# Altium PCB DB42.PcbDoc (part 5 of 8)
Units mil, origin at the board's own origin, x right, y up, seen from the top; angles counter-clockwise.
Board outline 3236.22 x 4456.69 mil, 8 copper layers (Top Layer, MidLayer1, MidLayer2, GND-Layer5, MidLayer3, VCC, MidLayer4, Bottom Layer), stack 62.194 mil thick; 214 components, 470 nets, 1802 pads, 1663 vias.
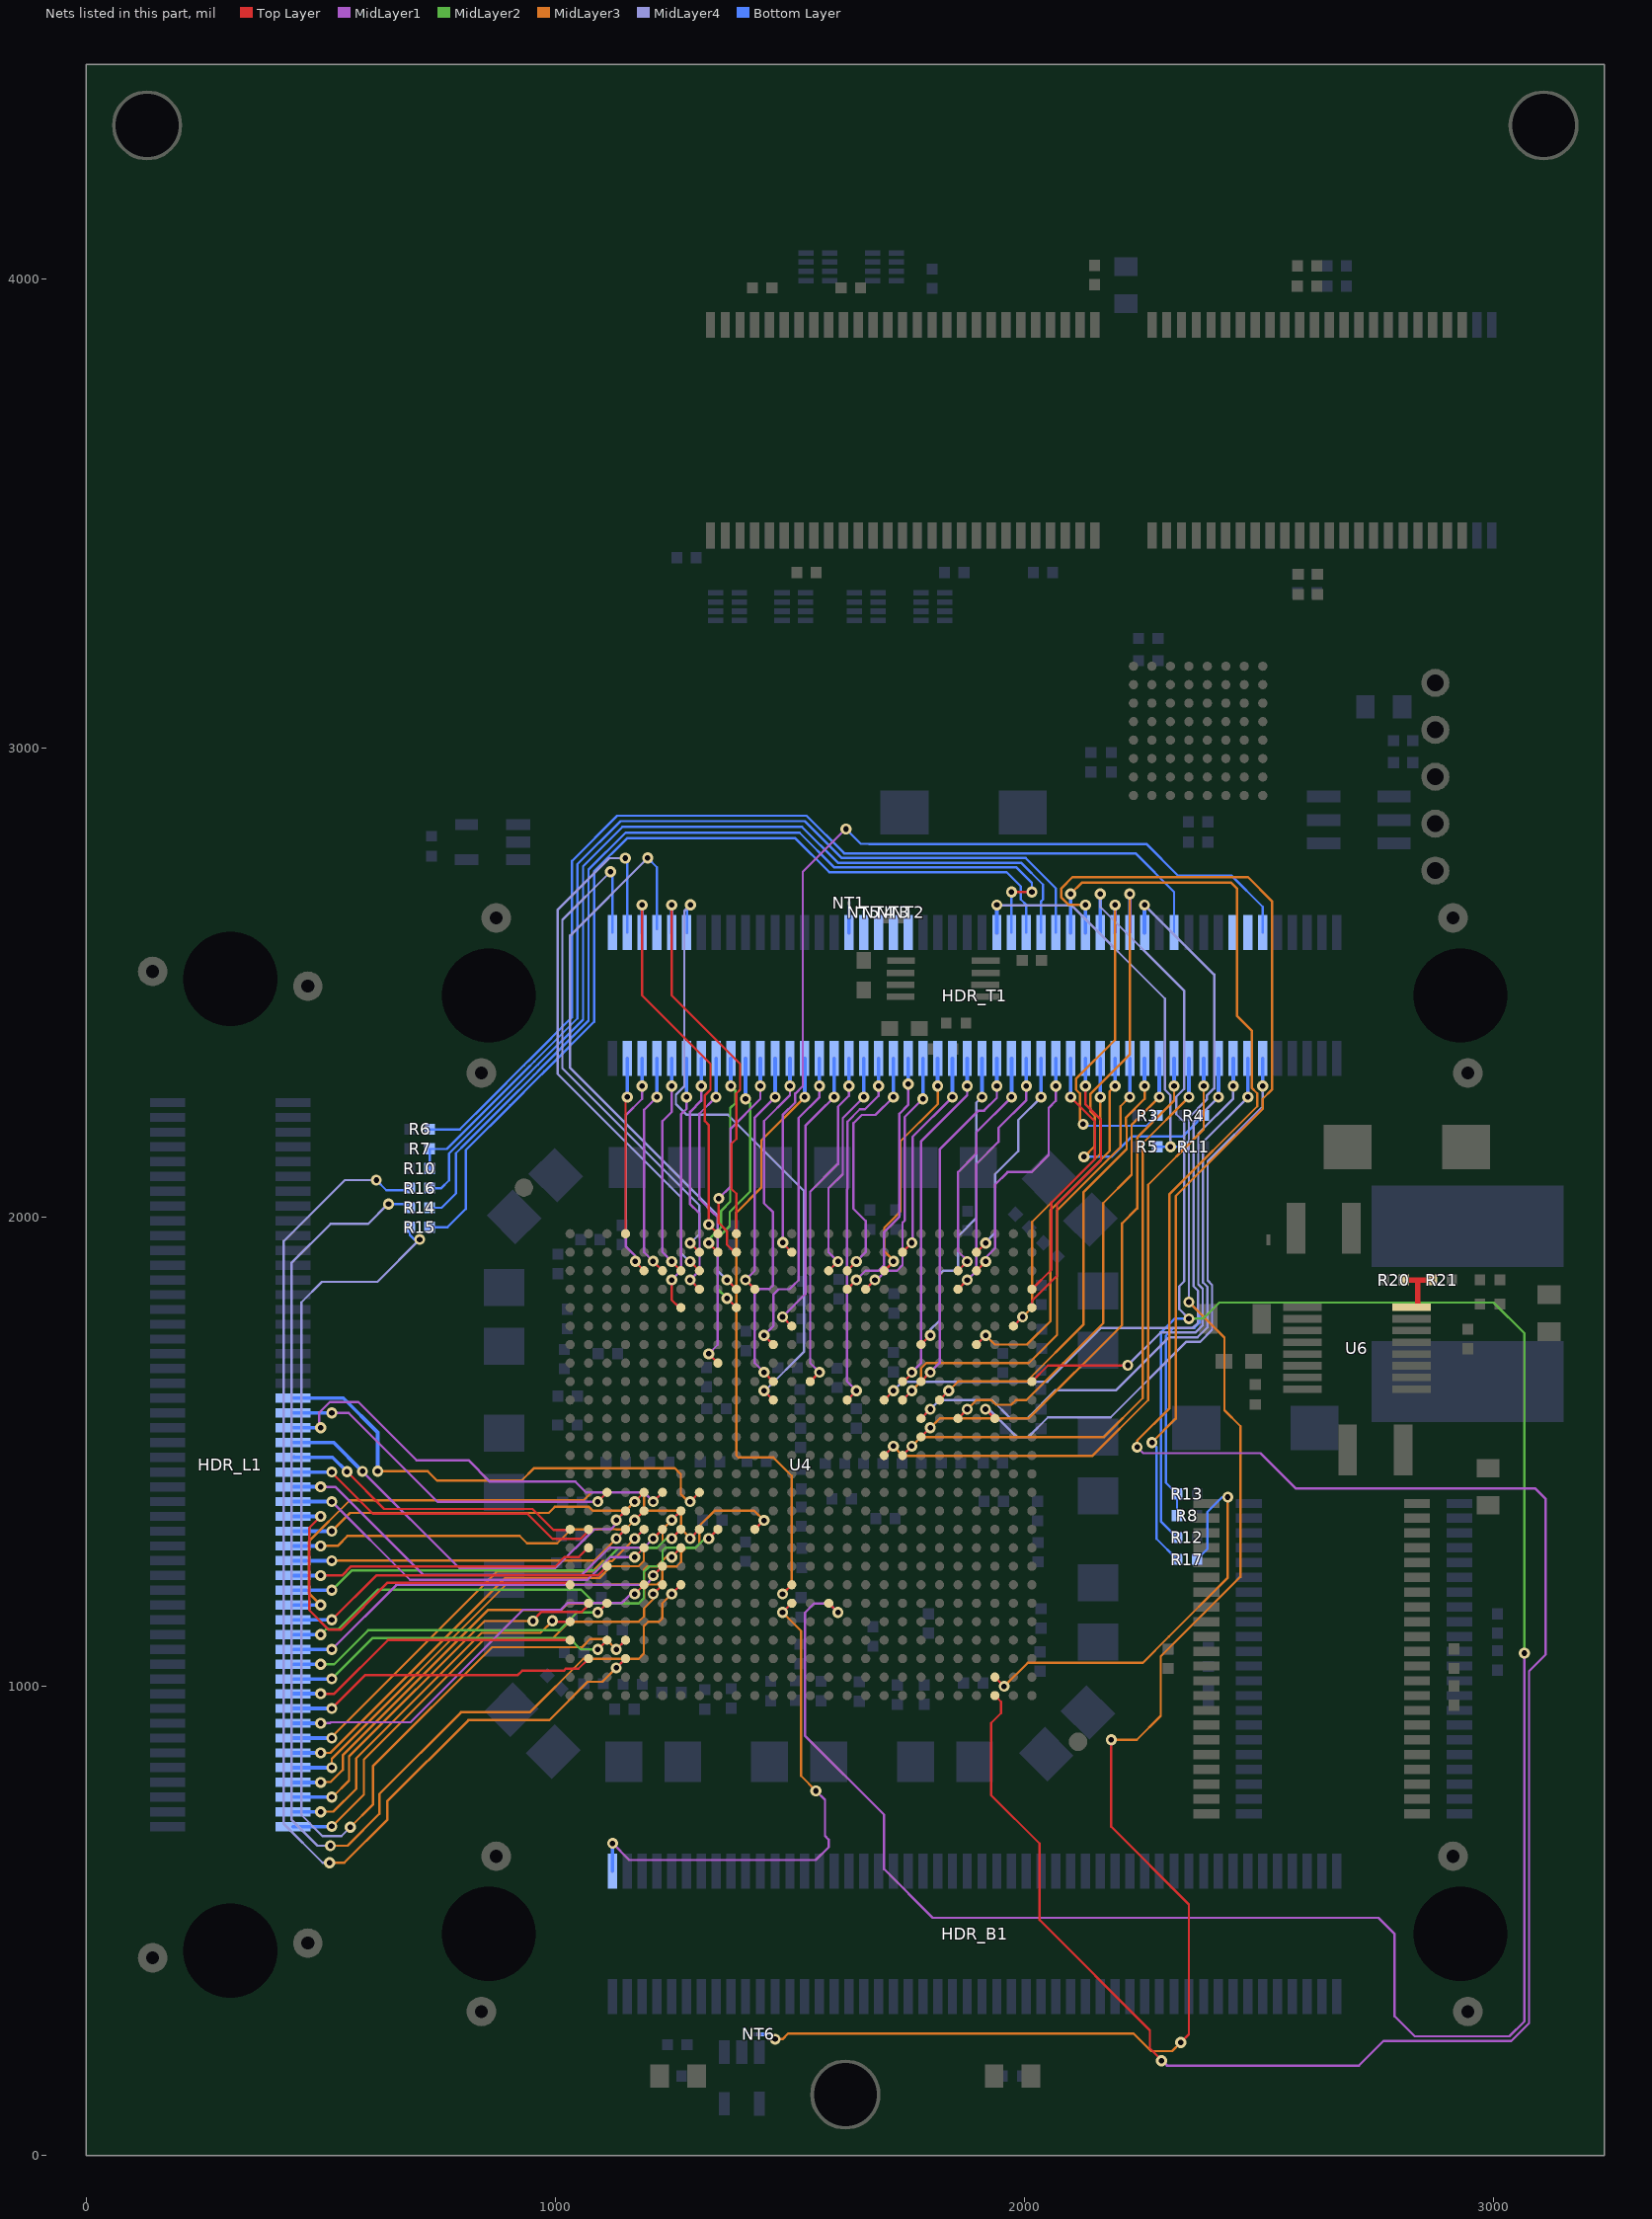
[diagram p11: the nets of this part, all layers, seen from the top]

## Via types
v1: diameter 23.62, hole 11.81, Top Layer to Bottom Layer, 1081 vias
v2: diameter 23.62, hole 11.81, Top Layer to Bottom Layer, tented both sides, 466 vias
v3: diameter 27.56, hole 15.75, Top Layer to Bottom Layer, 116 vias

## Nets (pads, with @x,y where several pads share a name; then routed paths per layer and width w, separated by ;. In a path a pad name is that pad's centre, name@x,y a point inside that pad or via, vN(x,y) a via of type N, cw(c..) or ccw(c..) an arc to the next point about the centre after c; other vN are vias at no path point) (continued)
EXTEND_B20: HDR_L1.42 U4.R8 | length 1060.6
  Top Layer w5: v1(1287.4,1393.7) U4.R8@1307.09,1413.39
  MidLayer3 w5: v2(621.34,1458.59) 727.86,1458.59 747.84,1438.61 928.18,1438.61 954.75,1465.18 1254.21,1465.18 1267.5,1451.89 1267.5,1409.73 1283.53,1393.7 v1(1287.4,1393.7)
  Bottom Layer w7.87: HDR_L1.42@440.94,1614.17 548.1,1614.17 621.34,1540.93 v2(621.34,1458.59)
EXTEND_B21: HDR_L1.44 U4.R3 | length 754.7
  Top Layer w5: v1(1090.55,1393.7) U4.R3@1110.24,1413.39
  MidLayer1 w5: v2(523.62,1582.68) 559.49,1582.68 748.86,1393.31 v1@1089.37,1393.31
  Bottom Layer w7.87: HDR_L1.44@440.94,1582.67 v2(523.62,1582.68)
EXTEND_B22: HDR_L1.46 U4.R6 | length 928.4
  Top Layer w5: v1(1208.66,1393.7) U4.R6@1228.35,1413.39
  MidLayer1 w5: v2@501.17,1553.15 496.82,1557.5 496.82,1583.43 519.29,1605.91 580.01,1605.91 704.01,1481.9 814.75,1481.9 860.53,1436.13 1043,1436.13 1065.75,1413.39 1188.18,1413.39 1188.58,1413.78 v1(1208.66,1393.7)
  Bottom Layer w7.87: HDR_L1.46@440.94,1551.18 v2(500,1551.18)
EXTEND_B23: HDR_L1.48 U4.T4 | length 875.1
  Top Layer w5: v1(1129.92,1354.33) U4.T4@1149.61,1374.02
  MidLayer1 w5: v2(589.03,1458.19) 795.58,1251.65 999.88,1251.65 1083.11,1334.87 1118.57,1334.87 1129.92,1346.23 v1(1129.92,1354.33)
  Bottom Layer w7.87: HDR_L1.48@440.94,1519.68 523.62,1519.68 527.54,1519.68 v2(589.03,1458.19)
EXTEND_B24: HDR_L1.50 U4.U1 | length 654.8
  Top Layer w5: v2(555.93,1457.41) 635.25,1378.09 951.24,1378.09 996.03,1333.3 U4.U1@1031.1,1333.3
  Bottom Layer w7.87: HDR_L1.50@440.94,1488.19 HDR_L1.50@442.07,1488.19 ; HDR_L1.50@442.41,1488.53 HDR_L1.50@442.07,1488.19 ; v2(555.93,1457.41) 525.15,1488.19 HDR_L1.50@442.07,1488.19
EXTEND_B25: HDR_L1.52 U4.U2 | length 696.2
  Top Layer w5: v2@523,1456.07 611.34,1367.72 940.73,1367.72 994.06,1314.38 1053.95,1314.38 U4.U2@1070.87,1331.3
  Bottom Layer w7.87: HDR_L1.52@440.94,1456.69 v2(523.62,1456.69)
EXTEND_B26: HDR_L1.54 U4.U6 | length 905.1
  Top Layer w5: v1(1208.66,1314.96) U4.U6@1228.35,1334.65
  MidLayer1 w5: v2(500,1425.2) 531.11,1425.2 718.48,1237.83 1057.23,1237.83 1114.87,1295.47 1189.09,1295.47 1208.58,1314.96 v1(1208.66,1314.96)
  Bottom Layer w7.87: HDR_L1.54@440.94,1425.19 v2(500,1425.2)
EXTEND_B27: HDR_L1.56 U4.V5 | length 846.1
  Top Layer w5: v1(1169.29,1275.59) U4.V5@1188.98,1295.28
  MidLayer1 w5: v2(523.62,1393.7) v2@523.75,1393.7 ; v2@523.75,1393.58 690.32,1227.01 1068.58,1227.01 1117.17,1275.59 v1(1169.29,1275.59) v1@1169.29,1274.8
  Bottom Layer w7.87: HDR_L1.56@440.94,1393.7 v2(523.62,1393.7)
EXTEND_B28: HDR_L1.58 U4.Y1 | length 885.8
  Top Layer w5: v2(500,1362.21) 475.56,1337.76 475.56,1162.3 517.32,1120.54 542.18,1120.54 642.65,1221.01 1027.03,1221.01 U4.Y1@1031.5,1216.54
  Bottom Layer w7.87: HDR_L1.58@440.94,1362.2 v2(500,1362.21)
EXTEND_B29: HDR_L1.60 U4.R5 | length 790.8
  Top Layer w5: v1(1169.29,1393.7) U4.R5@1188.98,1413.39
  MidLayer3 w5: v2@522,1331 523.62,1331 562.35,1369.73 985.97,1369.73 998.76,1382.52 1071.93,1382.52 1080.43,1374.02 1149.61,1374.02 v1(1169.29,1393.7)
  Bottom Layer w7.87: HDR_L1.60@440.94,1330.71 v2(523.62,1330.71)
EXTEND_B30: HDR_L1.62 U4.T5 | length 791.5
  Top Layer w5: v1(1169.29,1354.33) U4.T5@1188.98,1374.02
  MidLayer3 w5: v2@501.17,1299.41 535.83,1299.41 556.94,1320.53 923.98,1320.53 939.72,1304.78 1003.78,1304.78 1033.25,1334.25 1090.07,1334.25 1090.84,1335.02 1129.63,1335.02 1130.38,1334.26 1149.23,1334.26 v1(1169.29,1354.33)
  Bottom Layer w7.87: HDR_L1.62@440.94,1299.21 v2(500,1299.21)
EXTEND_B31: HDR_L1.64 U4.U4 | length 740.1
  Top Layer w5: v1(1129.92,1314.96) U4.U4@1149.61,1334.65
  MidLayer3 w5: v2(523.62,1267.72) v2@525.2,1267.72 ; v2@523.62,1269.29 524.41,1268.5 v2@525.2,1267.72 ; v1@1131.1,1315.75 1130.12,1314.76 1083.07,1267.72 v2@525.2,1267.72
  Bottom Layer w7.87: HDR_L1.64@440.94,1267.71 v2(523.62,1267.72)
EXTEND_B32: HDR_L1.66 U4.V2 | length 655.6
  Top Layer w5: v2@501.58,1237.8 v2(500,1236.22) 545.28,1236.22 564.73,1255.67 ; 564.82,1255.58 999.63,1255.58 1019.42,1275.38 1050.01,1275.38 U4.V2@1069.91,1295.28
  Bottom Layer w7.87: HDR_L1.66@440.94,1236.22 v2(500,1236.22)
EXTEND_B33: HDR_L1.68 U4.U7 | length 880.6
  Top Layer w5: v1(1248.03,1314.96) U4.U7@1267.72,1334.65
  MidLayer2 w5: v2(523.62,1204.72) 565.63,1246.73 1086.34,1246.73 1134.69,1295.08 1216.67,1295.08 1236.55,1314.96 v1(1248.03,1314.96)
  Bottom Layer w7.87: HDR_L1.68@440.94,1204.72 v2(523.62,1204.72)
EXTEND_B34: HDR_L1.70 U4.U8 | length 1160.6
  Top Layer w5: v1(1287.4,1314.96) U4.U8@1307.09,1334.65
  MidLayer3 w5: v2@499.2,1174.03 473.98,1199.25 473.98,1308.47 562.05,1396.54 1060.3,1396.54 1077.48,1413.72 1179.53,1413.72 1189.09,1404.17 1189.09,1380.18 1195,1374.27 1258.83,1374.27 1267.89,1365.21 1267.89,1335.66 v1@1287.4,1316.15
  Bottom Layer w7.87: HDR_L1.70@440.94,1173.23 v2(500,1173.23)
EXTEND_B35: HDR_L1.72 U4.W3 | length 716.6
  Top Layer w5: v2(523.62,1141.73) 618.11,1236.22 1090.55,1236.22 U4.W3@1110.24,1255.91
  Bottom Layer w7.87: HDR_L1.72@440.94,1141.73 v2(523.62,1141.73)
EXTEND_B36: HDR_L1.74 U4.U9 | length 1069.3
  Top Layer w5: v1(1326.77,1314.96) U4.U9@1346.46,1334.65
  MidLayer2 w5: v2(500,1110.24) 511.48,1121.72 537.4,1121.72 622.03,1206.34 1054.29,1206.34 1083.75,1176.88 1178.06,1176.88 1188.7,1187.52 1188.7,1243.86 1200.91,1256.07 1218.25,1256.07 1228.49,1266.32 1228.49,1289.17 1234.8,1295.47 1299.02,1295.47 1318.51,1314.96 v1(1326.77,1314.96)
  Bottom Layer w7.87: HDR_L1.74@440.94,1110.23 v2(500,1110.24)
EXTEND_B37: HDR_L1.76 U4.W6 | length 863.1
  Top Layer w5: v1(1208.66,1236.22) U4.W6@1228.35,1255.91
  MidLayer1 w5: v2(523.62,1078.74) 661.16,1216.28 1192.64,1216.28 1208.66,1232.3 v1(1208.66,1236.22)
  Bottom Layer w7.87: HDR_L1.76@440.94,1078.74 v2(523.62,1078.74)
EXTEND_B38: HDR_L1.78 U4.AA3 | length 723.1
  Top Layer w5: v1(1090.55,1157.48) U4.AA3@1110.24,1177.17
  MidLayer2 w5: v2(500,1047.25) 528.68,1047.25 600.72,1119.29 1008.57,1119.29 1046.77,1157.48 v1(1090.55,1157.48)
  Bottom Layer w7.87: HDR_L1.78@440.94,1047.24 v2(500,1047.25)
EXTEND_B39: HDR_L1.80 U4.AC3 | length 723.7
  Top Layer w5: v1(1090.55,1078.74) U4.AC3@1110.24,1098.42
  MidLayer2 w5: v2(523.62,1015.75) 610.94,1103.06 1029.54,1103.06 1053.86,1078.74 v1(1090.55,1078.74)
  Bottom Layer w7.87: HDR_L1.80@440.94,1015.74 v2(523.62,1015.75)
EXTEND_B40: HDR_L1.82 U4.AC1 | length 638.2
  Top Layer w5: v2(500,984.25) 528.74,984.25 643.19,1098.7 1003.94,1098.7 ; 1003.7,1098.42 U4.AC1@1031.5,1098.42
  Bottom Layer w7.87: HDR_L1.82@440.94,984.25 v2(500,984.25)
EXTEND_B41: HDR_L1.84 U4.AD2 | length 673
  Top Layer w5: v2(523.62,952.75) 595.17,1024.3 920.13,1024.3 929.02,1033.2 1017.85,1033.2 1022.17,1037.52 1049.29,1037.52 1070.04,1058.27 U4.AD2@1070.04,1058.5
  Bottom Layer w7.87: HDR_L1.84@440.94,952.75 v2(523.62,952.75)
EXTEND_B42: HDR_L1.86 U4.Y5 | length 873.2
  Top Layer w5: v1(1169.29,1196.85) U4.Y5@1188.98,1216.54
  MidLayer1 w5: v2(500,921.26) 499.26,922 500,922 520.28,922 521.82,923.54 ; 520.47,923.54 521.82,923.54 ; v1(1169.29,1196.85) 1161,1196.85 1141.42,1177.27 1025.58,1177.27 1011.79,1163.48 931.42,1163.48 691.47,923.54 521.82,923.54
  Bottom Layer w7.87: HDR_L1.86@440.94,921.26 v2(500,921.26)
EXTEND_B43: HDR_L1.88 U4.U5 | length 933.4
  Top Layer w5: v1(1169.29,1314.96) U4.U5@1188.98,1334.65
  MidLayer3 w5: v2@522,891 522.19,891.19 875.58,1244.58 1078.75,1244.58 1101.1,1266.93 1121.26,1266.93 v1(1169.29,1314.96)
  Bottom Layer w7.87: HDR_L1.88@440.94,889.76 v2(523.62,889.76)
EXTEND_B44: HDR_L1.90 U4.T7 | length 1070.2
  Top Layer w5: v1(1248.03,1354.33) U4.T7@1267.72,1374.02
  MidLayer3 w5: v2(500,858.27) 520.27,858.27 892.83,1230.83 1093.57,1230.83 1118.81,1256.07 1177.67,1256.07 1188.7,1267.1 1188.7,1289.17 1194.81,1295.28 1217.72,1295.28 1223.92,1301.48 1228.72,1306.28 1228.72,1335.02 v1(1248.03,1354.33)
  Bottom Layer w7.87: HDR_L1.90@440.94,858.26 v2(500,858.27)
EXTEND_B45: HDR_L1.92 U4.V7 | length 1045
  Top Layer w5: v1(1248.03,1275.59) U4.V7@1267.72,1295.28
  MidLayer3 w5: v2(523.62,826.77) 523.62,845.62 894.54,1216.54 1178.71,1216.54 1189.09,1226.92 1189.09,1249.37 1195.25,1255.53 1216.16,1255.53 1236.22,1275.59 v1(1248.03,1275.59)
  Bottom Layer w7.87: HDR_L1.92@440.94,826.77 v2(523.62,826.77)
EXTEND_B46: HDR_L1.94 U4.U11 | length 1358.1
  Top Layer w5: U4.U11@1425.2,1334.65 v1@1445.28,1354.72
  MidLayer3 w5: v2@500,796 521,796 546.84,821.84 546.84,852.84 857.09,1163.09 1012.54,1163.09 1026.33,1176.88 1179.24,1176.88 1189.09,1186.73 1189.09,1209.19 1196.81,1216.91 1217.32,1216.91 1227.97,1227.56 1227.97,1248.84 1231.92,1252.78 1234.66,1255.53 1258.66,1255.53 1268.09,1264.96 1268.09,1284.23 1279.13,1295.28 1299.21,1295.28 1306.71,1302.77 1306.71,1341.75 1338.98,1374.02 1424.41,1374.02 v1(1444.88,1353.54)
  Bottom Layer w7.87: HDR_L1.94@440.94,795.27 v2(500,795.28)
EXTEND_B47: HDR_L1.96 U4.AA2 | length 832.6
  Top Layer w5: v1@951.51,1139.84 970.49,1158.82 1056.57,1158.82 1070.87,1173.11 U4.AA2@1070.87,1177.17
  MidLayer3 w5: v2(523.62,763.78) v2@523.62,764 ; v2@525,764 560.48,799.48 560.48,850.48 849.05,1139.05 v1(952.3,1139.05)
  Bottom Layer w7.87: HDR_L1.96@440.95,763.78 v2(523.62,763.78)
EXTEND_B48: HDR_L1.98 U4.AB1 | length 795.6
  Top Layer w5: v1@995.32,1137.8 U4.AB1@1031.5,1137.8
  MidLayer3 w5: v2(500,732.28) 500.72,733 527,733 575.62,781.62 575.62,846.62 842.84,1113.84 968.06,1113.84 v1(993.67,1139.45)
  Bottom Layer w7.87: HDR_L1.98@440.94,732.28 v2(500,732.28)
EXTEND_B49: HDR_L1.100 U4.Y6 | length 1061.2
  Top Layer w5: v1(1208.66,1196.85) U4.Y6@1228.35,1216.54
  MidLayer3 w5: v1@523.62,700.79 523.96,701.12 592.02,769.18 592.02,844.02 847.61,1099.61 991.73,1099.61 1029.92,1137.79 1177.56,1137.79 1188.98,1149.21 1188.98,1166.24 1208.66,1185.92 v1(1208.66,1196.85)
  Bottom Layer w7.87: HDR_L1.100@440.94,700.78 523.49,700.79 v1@523.62,700.79
  other v1: 523.49,701.59
EXTEND_C0: HDR_T1.89 U4.L24 | length 1260.8
  Top Layer w5: v1(1916.93,1590.55) 1936.61,1570.87 U4.L24@1937.01,1570.87
  MidLayer4 w5: v1@1917.32,1589.37 1925.2,1589.37 1983.07,1531.5 2008.27,1531.5 2050,1573.23 2183.47,1573.23 2344.24,1734 2374,1734 2400,1760 2400,1855.43 2390.39,1865.03 2390.39,2118.74 2507.87,2236.22 v2(2507.87,2279.53)
  Bottom Layer w7.87: v2(2507.87,2279.53) HDR_T1.89@2507.88,2338.58
EXTEND_C1: HDR_T1.87 U4.L20 | length 1340.8
  Top Layer w5: U4.L20@1779.53,1570.87 v1(1799.21,1590.55)
  MidLayer4 w5: v1(1799.21,1590.55) 1818.9,1610.24 1931.1,1610.24 1970.47,1570.87 2005.91,1570.87 2066.54,1631.5 2195.67,1631.5 2308.17,1744 2369,1744 2390,1765 2390,1851.28 2380.39,1860.89 2380.39,2159.92 v2(2476.38,2255.9)
  Bottom Layer w7.87: v2(2476.38,2255.9) HDR_T1.87@2476.38,2338.58
EXTEND_C2: HDR_T1.85 U4.J26 | length 1017.6
  Top Layer w5: U4.J26@2015.75,1649.61 2050,1683.86 2219.68,1683.86 v1(2220.08,1684.25)
  MidLayer4 w5: v1(2220.08,1684.25) 2289.83,1754 2364.14,1754 2380,1769.86 2380,1847.14 2370.39,1856.75 2370.39,2178.39 2444.88,2252.88 v2(2444.88,2279.53)
  Bottom Layer w7.87: v2(2444.88,2279.53) HDR_T1.85@2444.88,2338.58
EXTEND_C3: HDR_T1.83 U4.K18 | length 1327
  Top Layer w5: U4.K18@1700.79,1610.24 v1(1720.47,1629.92)
  MidLayer4 w5: v1(1720.47,1629.92) 1739.84,1649.28 2048.89,1649.28 2163.61,1764 2359,1764 2370,1775 2370,1843 2360.39,1852.61 2360.39,2202.92 v2(2413.38,2255.9)
  Bottom Layer w7.87: v2(2413.38,2255.9) HDR_T1.83@2413.39,2338.58
EXTEND_C4: HDR_T1.81 U4.N18 | length 1406.5
  Top Layer w5: U4.N18@1700.79,1492.13 v1(1720.47,1511.81)
  MidLayer3 w5: v1(1720.47,1511.81) 1741.34,1490.94 2144.49,1490.94 2263.78,1610.24 2263.78,2068.95 2381.89,2187.05 v2(2381.89,2279.53)
  Bottom Layer w7.87: v2(2381.89,2279.53) HDR_T1.81@2381.89,2338.58
EXTEND_C5: HDR_T1.79 U4.N19 | length 1327.5
  Top Layer w5: U4.N19@1740.16,1492.13 v1(1759.84,1511.81)
  MidLayer3 w5: v1(1759.84,1511.81) 1779.53,1531.5 2169.29,1531.5 2251.97,1614.17 2251.97,2157.48 v2(2350.39,2255.9)
  Bottom Layer w7.87: v2(2350.39,2255.9) HDR_T1.79@2350.4,2338.58
EXTEND_C6: HDR_T1.77 U4.M20 | length 1141.7
  Top Layer w5: U4.M20@1779.53,1531.5 v1(1799.21,1551.18)
  MidLayer3 w5: v1(1799.21,1551.18) 1818.9,1570.87 2008.75,1570.87 2208.1,1770.22 2208.1,1986.7 2240.16,2018.76 2240.16,2169.29 2318.89,2248.03 v2(2318.89,2279.53)
  Bottom Layer w7.87: v2(2318.89,2279.53) HDR_T1.77@2318.9,2338.58
EXTEND_C7: HDR_T1.75 U4.L22 | length 1016.2
  Top Layer w5: U4.L22@1858.27,1570.87 v1(1877.95,1590.55)
  MidLayer3 w5: v1(1877.95,1590.55) 1897.64,1610.24 1929.13,1610.24 1939.37,1600 1971.65,1600 1981.89,1610.24 2003.93,1610.24 2082.83,1689.13 2167.75,1774.05 2167.75,2029.99 2228.35,2090.59 2228.35,2196.85 v2(2287.4,2255.9)
  Bottom Layer w7.87: v2(2287.4,2255.9) HDR_T1.75@2287.4,2338.58
EXTEND_C8: HDR_T1.73 U4.K21 | length 995.5
  Top Layer w5: U4.K21@1818.9,1610.24 v1(1838.58,1629.92)
  MidLayer3 w5: v1(1838.58,1629.92) 1858.64,1649.98 2004.7,1649.98 2125.44,1770.72 2125.44,2052.62 2217.94,2145.12 2217.94,2194.32 ; 2216.54,2194.32 2216.54,2212.6 2255.9,2251.97 v2(2255.9,2279.53)
  Bottom Layer w7.87: v2(2255.9,2279.53) HDR_T1.73@2255.91,2338.58
EXTEND_C9: HDR_T1.71 U4.K19 | length 1057.1
  Top Layer w5: U4.K19@1740.16,1610.24 v1(1759.84,1629.92)
  MidLayer3 w5: v1(1759.84,1629.92) 1779.15,1649.23 1779.15,1677.58 1790.55,1688.98 2009.33,1688.98 2069.35,1749 2069.35,2014.25 2204.72,2149.62 2204.72,2236.22 v2(2224.41,2255.9)
  Bottom Layer w7.87: v2(2224.41,2255.9) HDR_T1.71@2224.41,2338.58
EXTEND_C10: HDR_T1.69 U4.G23 | length 811.9
  Top Layer w5: U4.G23@1897.64,1728.35 v1(1917.32,1748.03)
  MidLayer3 w5: v1(1917.32,1748.03) 1937.01,1728.35 2005.3,1728.35 2055.21,1778.25 2055.21,2014.74 2181.5,2141.02 2181.5,2268.11 v2(2192.91,2279.53)
  Bottom Layer w7.87: v2(2192.91,2279.53) HDR_T1.69@2192.91,2338.58
EXTEND_C11: HDR_T1.67 U4.F25 | length 647.5
  Top Layer w5: U4.F25@1976.38,1767.72 v1(1996.06,1787.4)
  MidLayer3 w5: v1(1996.06,1787.4) 2010.23,1801.56 2016.22,1807.55 2016.22,1990.14 2161.42,2135.34 v2(2161.42,2255.9)
  Bottom Layer w7.87: v2(2161.42,2255.9) HDR_T1.67@2161.42,2338.58
EXTEND_C12: HDR_T1.65 U4.E26 | length 605.3
  Top Layer w5: U4.E26@2015.75,1807.09 2015.75,1821.65 2069.38,1875.29 2069.38,2027.07 2163,2120.69 2163,2207.25 2129.57,2240.68 ; 2129.92,2241.76 v2(2129.92,2279.53)
  Bottom Layer w7.87: v2(2129.92,2279.53) HDR_T1.65@2129.92,2338.58
EXTEND_C13: HDR_T1.63 U4.D26 | length 569.1
  Top Layer w5: U4.D26@2015.75,1846.46 2057.31,1888.02 2057.31,2030.74 2150,2123.43 2150,2204.33 v2(2098.42,2255.9)
  Bottom Layer w7.87: v2(2098.42,2255.9) HDR_T1.63@2098.43,2338.58
EXTEND_C14: HDR_T1.61 U4.C23 | length 552.9
  Top Layer w5: U4.C23@1897.64,1885.83 v1(1917.32,1905.51)
  MidLayer1 w5: v1(1917.32,1905.51) 1917.32,1913.78 1937.38,1933.84 1937.38,2069.35 1963.95,2095.92 2015.23,2095.92 2051.64,2132.33 2051.64,2232.74 2066.93,2248.03 v2(2066.93,2279.53)
  Bottom Layer w7.87: v2(2066.93,2279.53) HDR_T1.61@2066.93,2338.58
EXTEND_C15: HDR_T1.59 U4.B23 | length 470.5
  Top Layer w5: U4.B23@1897.64,1925.2 v1(1917.32,1944.88)
  MidLayer4 w5: v1(1917.32,1944.88) 1917.32,1946.46 1937.01,1966.14 1937.01,2091 1986.7,2140.69 1986.7,2207.17 v2(2035.43,2255.9)
  Bottom Layer w7.87: v2(2035.43,2255.9) HDR_T1.59@2035.43,2338.58
EXTEND_C16: HDR_T1.57 U4.D22 | length 552.5
  Top Layer w5: U4.D22@1858.27,1846.46 v1(1877.95,1866.14)
  MidLayer1 w5: v1(1877.95,1866.14) 1897.26,1885.45 1897.26,2113.26 1944.35,2160.35 1944.35,2189.84 2003.93,2249.42 v2(2003.93,2279.53)
  Bottom Layer w7.87: v2(2003.93,2279.53) HDR_T1.57@2003.94,2338.58
EXTEND_C17: HDR_T1.55 U4.C22 | length 516.8
  Top Layer w5: U4.C22@1858.27,1885.83 v1(1877.95,1905.51)
  MidLayer1 w5: v1@1878.74,1905.91 1878.74,1906.3 1858.27,1926.77 1858.27,1985.83 1858.27,2096 1897,2134.73 1897,2180.47 ; 1897,2181 1897,2180.47 ; v2(1972.44,2255.9) 1897,2180.47
  Bottom Layer w7.87: v2(1972.44,2255.9) HDR_T1.55@1972.44,2338.58
EXTEND_C18: HDR_T1.53 U4.J20 | length 762.8
  Top Layer w5: U4.J20@1779.53,1649.61 v1(1799.21,1669.29)
  MidLayer1 w5: v1(1799.21,1669.29) 1819.27,1689.35 1819.27,2144.27 1902,2227 1913.94,2227 1940.94,2254 v2(1940.94,2279.53)
  Bottom Layer w7.87: v2(1940.94,2279.53) HDR_T1.53@1940.95,2338.58
EXTEND_C19: HDR_T1.51 U4.G20 | length 677.7
  Top Layer w5: U4.G20@1779.53,1728.35 v1(1799.21,1748.03)
  MidLayer4 w5: v1(1799.21,1748.03) 1799.21,1759.94 1818.9,1779.63 1818.9,1878.35 1826.38,1885.83 1849.61,1885.83 1858.27,1894.49 1858.27,1959 1897.04,1997.78 1897.04,2243.5 v2(1909.45,2255.9)
  Bottom Layer w7.87: v2(1909.45,2255.9) HDR_T1.51@1909.45,2338.58
EXTEND_C20: HDR_T1.49 U4.J19 | length 746.1
  Top Layer w5: U4.J19@1746.82,1654.06 1760.95,1668.19 v1@1766.51,1673.74
  MidLayer1 w5: v1(1759.84,1669.29) 1779.15,1688.6 1779.15,2161.05 1791.5,2173.4 1877.95,2259.84 v2(1877.95,2279.53)
  Bottom Layer w7.87: v2(1877.95,2279.53) HDR_T1.49@1877.95,2338.58
EXTEND_C21: HDR_T1.47 U4.B19 | length 455.9
  Top Layer w5: U4.B19@1740.16,1925.2 v1(1759.84,1945.28)
  MidLayer1 w5: v1@1761.42,1946.06 1761.42,2170.87 v2(1846.46,2255.9)
  Bottom Layer w7.87: v2(1846.46,2255.9) HDR_T1.47@1846.46,2338.58
EXTEND_C22: HDR_T1.45 U4.C18 | length 510.4
  Top Layer w5: U4.C18@1706.3,1887.8 1706.3,1890.55 v1@1720.87,1905.51
  MidLayer3 w5: v1@1720.87,1907.48 1700.98,1927.36 1700.98,1977.36 1735.43,2011.81 1735.43,2161.43 1815.18,2241.18 1815.18,2279.3 v2(1814.96,2279.53)
  Bottom Layer w7.87: v2(1814.96,2279.53) HDR_T1.45@1814.96,2338.58
  other v1: 1720.87,1905.91
EXTEND_C23: HDR_T1.43 U4.D17 | length 558.8
  Top Layer w5: U4.D17@1661.42,1846.46 v1(1681.1,1866.14)
  MidLayer1 w5: v1(1681.1,1866.14) 1685.04,1866.14 1704.72,1885.83 1728.35,1885.83 1740.18,1897.66 1740.18,1988.17 ; 1740.16,1988.19 1744.88,1992.91 1744.88,2213.38 v2(1783.46,2251.96)
  Bottom Layer w7.87: v2(1783.46,2251.96) HDR_T1.43@1783.47,2338.58
EXTEND_C24: HDR_T1.41 U4.D16 | length 561.9
  Top Layer w5: U4.D16@1622.05,1846.46 v1(1641.73,1866.14)
  MidLayer1 w5: v1(1641.73,1866.14) 1661.42,1885.83 1688.73,1885.83 1700.81,1897.91 1700.81,1968.52 1733.46,2001.18 1733.46,2047.64 1733.46,2220.46 1751.97,2238.97 v2@1751.97,2279.53
  Bottom Layer w7.87: v2@1751.97,2279.53 HDR_T1.41@1751.97,2338.58
  other v2: 1751.97,2283.46
EXTEND_C25: HDR_T1.39 U4.C16 | length 533
  Top Layer w5: U4.C16@1622.05,1885.83 v1(1641.73,1905.51)
  MidLayer1 w5: v1(1641.73,1905.51) 1661.42,1925.2 1661.42,1992.13 1635.43,2018.11 1635.43,2200.25 1653.12,2217.94 1682.5,2217.94 v2(1720.47,2255.9)
  MidLayer3 w5: v1@1640.55,1905.91 v1@1641.34,1905.91
  Bottom Layer w7.87: v2(1720.47,2255.9) HDR_T1.39@1720.47,2338.58
EXTEND_C26: HDR_T1.37 U4.K16 | length 779.3
  Top Layer w5: U4.K16@1622.05,1610.24 v1(1641.73,1629.92)
  MidLayer1 w5: 1621.61,1982.63 1622.05,1983.07 ; v1(1641.73,1629.92) 1622.05,1649.61 1622.05,1983.07 ; v2(1688.97,2279.53) 1688.98,2258.71 1660.01,2229.74 1649.18,2229.74 1622.83,2203.39 1622.83,2059.84 1622.05,2059.06 1622.05,1983.07
  Bottom Layer w7.87: v2(1688.97,2279.53) HDR_T1.37@1688.98,2338.58
EXTEND_C27: HDR_T1.35 U4.C15 | length 500.4
  Top Layer w5: U4.C15@1582.68,1885.83 v1(1602.36,1905.51)
  MidLayer1 w5: v1(1602.36,1905.51) 1582.3,1925.57 1582.3,2061.44 1612.6,2091.73 1612.6,2211.02 v2(1657.48,2255.9)
  Bottom Layer w7.87: v2(1657.48,2255.9) HDR_T1.35@1657.48,2338.58
EXTEND_C28: HDR_T1.33 U4.J14 | length 739.5
  Top Layer w5: U4.J14@1543.31,1649.61 v1(1562.99,1669.29)
  MidLayer1 w5: v1(1562.99,1669.29) 1543.31,1688.98 1543.31,2054.33 1602.36,2113.39 1602.36,2235.07 1625.98,2258.69 v2(1625.98,2279.53)
  Bottom Layer w7.87: v2(1625.98,2279.53) HDR_T1.33@1625.99,2338.58
EXTEND_C29: HDR_T1.31 U4.F13 | length 624.8
  Top Layer w5: v1(1484.25,1787.4) U4.F13@1503.94,1767.72
  MidLayer1 w5: v1(1484.25,1787.4) 1533.07,1836.22 1533.07,2194.88 1576.77,2238.58 ; 1576.97,2238.39 v2(1594.49,2255.9)
  Bottom Layer w7.87: v2(1594.49,2255.9) HDR_T1.31@1594.49,2338.58
EXTEND_C30: HDR_T1.29 U4.G12 | length 680.9
  Top Layer w5: v1(1444.88,1748.03) U4.G12@1464.57,1728.35
  MidLayer1 w5: v1(1444.88,1748.03) 1464.57,1767.72 1464.57,1835.04 1475.98,1846.46 1499.21,1846.46 1506.46,1853.7 1518.5,1865.75 1518.5,2211.42 1562.99,2255.9 v2(1562.99,2279.53)
  Bottom Layer w7.87: v2(1562.99,2279.53) HDR_T1.29@1562.99,2338.58
EXTEND_C31: HDR_T1.27 U4.Y13 | length 1330.5
  Top Layer w5: v1(1484.25,1196.85) U4.Y13@1503.94,1216.54
  MidLayer3 w5: v1(1484.25,1196.85) 1503.94,1216.54 1503.94,1448.82 1464.57,1488.19 1389.76,1488.19 1386.2,1491.75 1386.2,2009.85 1439.13,2062.79 1439.13,2163.54 v2(1531.5,2255.9)
  Bottom Layer w7.87: v2(1531.5,2255.9) HDR_T1.27@1531.5,2338.58
EXTEND_C32: HDR_T1.25 U4.J12 | length 764.3
  Top Layer w5: v1(1444.88,1669.29) U4.J12@1464.57,1649.61
  MidLayer1 w5: v1(1444.88,1669.29) 1424.82,1689.35 1424.82,1835.45 1436.2,1846.83 1456.28,1846.83 1464.19,1854.74 1464.19,2010.22 1444.88,2029.53 1444.88,2204.72 1500,2259.84 v2(1500,2279.53)
  Bottom Layer w7.87: v2(1500,2279.53) HDR_T1.25@1500,2338.58
EXTEND_C33: HDR_T1.23 U4.D11 | length 526.4
  Top Layer w5: v1(1405.51,1866.14) U4.D11@1425.2,1846.46
  MidLayer1 w5: v1(1405.51,1866.14) 1425.2,1885.83 1425.2,2212.6 v2(1468.5,2255.9)
  Bottom Layer w7.87: v2(1468.5,2255.9) HDR_T1.23@1468.5,2338.58
EXTEND_C34: HDR_T1.21 U4.B10 | length 466.1
  Top Layer w5: v1(1348.43,2039.76) 1348.43,1987.83 1365.75,1970.5 1365.75,1941.73 1382.28,1925.2 U4.B10@1385.83,1925.2
  MidLayer1 w5: v1@1349.21,2040.94 1373.62,2065.35 1373.62,2188.58 1437.01,2251.97 v2(1437.01,2279.53)
  Bottom Layer w7.87: v2(1437.01,2279.53) HDR_T1.21@1437.01,2338.58
EXTEND_C35: HDR_T1.19 U4.E10 | length 577
  Top Layer w5: v1(1366.14,1826.77) U4.E10@1385.83,1807.09
  MidLayer2 w5: v1(1366.14,1826.77) 1346.26,1846.65 1346.26,1955.31 1371.65,1980.71 1371.65,2011.02 1415.75,2055.12 1415.75,2241.73 v2(1405.51,2251.97)
  Bottom Layer w7.87: v2@1405.51,2255.9 HDR_T1.19@1405.51,2338.58
EXTEND_C36: HDR_T1.17 U4.B9 | length 449.3
  Top Layer w5: v1(1326.77,1944.88) U4.B9@1346.46,1925.2
  MidLayer2 w5: v1(1326.77,1944.88) 1326.77,1951.57 1353.54,1978.35 1353.54,2013.78 1372.83,2033.07 1372.83,2232.28 1383.86,2243.31 1383.86,2269.68 v2(1374.02,2279.53)
  Bottom Layer w7.87: v2(1374.02,2279.53) HDR_T1.17@1374.02,2338.58
EXTEND_C37: HDR_T1.15 U4.H9 | length 696.7
  Top Layer w5: v1(1326.77,1708.66) U4.H9@1346.46,1688.98
  MidLayer1 w5: v1(1326.77,1708.66) 1346.08,1727.97 1346.08,1999.98 1339.37,2006.69 ; 1339.17,2006.5 1307.09,2038.58 1307.09,2220.47 v2(1342.52,2255.9)
  Bottom Layer w7.87: v2(1342.52,2255.9) HDR_T1.15@1342.52,2338.58
EXTEND_C38: HDR_T1.13 U4.D8 | length 526.8
  Top Layer w5: v1(1287.4,1866.14) U4.D8@1307.09,1846.46
  MidLayer1 w5: v1(1287.4,1866.14) 1307.46,1886.2 1307.46,2007.89 1303.94,2011.42 ; 1303.74,2011.22 1287.4,2027.56 1287.4,2224.41 1311.02,2248.03 v2(1311.02,2279.53)
  Bottom Layer w7.87: v2(1311.02,2279.53) HDR_T1.13@1311.02,2338.58
EXTEND_C39: HDR_T1.11 U4.E7 | length 554.8
  Top Layer w5: v1(1248.03,1866.14) 1248.03,1823.23 1264.17,1807.09 U4.E7@1267.72,1807.09
  MidLayer1 w5: v1(1248.03,1866.14) 1267.72,1885.83 1267.72,2218.87 1279.53,2230.68 v2(1279.53,2255.9)
  Bottom Layer w7.87: v2(1279.53,2255.9) HDR_T1.11@1279.53,2338.58
EXTEND_C40: HDR_T1.12 U4.K12 | length 1334.6
  Top Layer w5: v1(1444.88,1629.92) U4.K12@1464.57,1610.24
  MidLayer4 w5: v2(1288.19,2665.75) 1274.8,2652.36 1274.8,2278.74 1257.09,2261.02 1257.09,2240.94 1279.89,2218.14 1368.11,2218.14 1529.92,2056.33 1529.92,1712.99 1451.18,1634.25 v1@1449.21,1634.25
  Bottom Layer w5: HDR_T1.12@1280.31,2605.91 1280.31,2606.3 1280.31,2657.87 v2(1288.19,2665.75)
EXTEND_C41: HDR_T1.9 U4.C7 | length 477.2
  Top Layer w5: v1(1248.03,1905.51) U4.C7@1267.72,1885.83
  MidLayer1 w5: v1(1248.03,1905.51) 1228.35,1925.2 1228.35,2204.72 1248.03,2224.41 v2(1248.03,2279.53)
  Bottom Layer w7.87: v2(1248.03,2279.53) HDR_T1.9@1248.03,2338.58
EXTEND_C42: HDR_T1.10 U4.A10 | length 831.9
  Top Layer w5: v2(1248.03,2665.35) 1248.03,2472.44 1393.7,2326.78 1393.7,2271.65 1385.83,2263.78 1385.83,2166.96 1375.59,2156.72 1375.59,2060.24 1385.83,2050 U4.A10@1385.83,1964.57
  Bottom Layer w7.87: HDR_T1.10@1248.03,2606.3 v2(1248.03,2665.35)
EXTEND_C43: HDR_T1.7 U4.C6 | length 480.2
  Top Layer w5: v1@1208.66,1905.51 U4.C6@1228.35,1885.83
  MidLayer1 w5: v1@1208.66,1905.51 1208.2,1905.97 1189.35,1924.82 1189.35,2228.72 v2(1216.54,2255.9)
  Bottom Layer w7.87: v2(1216.54,2255.9) HDR_T1.7@1216.54,2338.58
  other v1: 1208.4,1906.17
EXTEND_C44: HDR_T1.8 U4.D10 | length 1295.1
  Top Layer w5: v1(1366.14,1866.14) U4.D10@1385.83,1846.46
  MidLayer4 w5: v1(1196.85,2765.35) 1197.24,2764.96 1196.85,2764.96 1196.46,2764.96 1031.5,2600 1031.5,2318.11 1346.46,2003.15 1346.46,1885.43 1365.94,1865.95 v1@1366.14,1865.75
  Bottom Layer w5: v1(1196.85,2765.35) 1216.54,2745.67 HDR_T1.8@1216.54,2613.78
EXTEND_C45: HDR_T1.5 U4.C5 | length 483
  Top Layer w5: v1@1169.68,1905.12 U4.C5@1188.98,1885.83
  MidLayer1 w5: v1(1170.47,1905.91) 1169.39,1906.99 1169.39,1918.4 1164.55,1923.25 1149.98,1937.82 1149.98,1945.34 1149.98,2216.91 1185.04,2251.97 v2(1185.04,2279.53)
  Bottom Layer w7.87: v2(1185.04,2279.53) HDR_T1.5@1185.04,2338.58
EXTEND_C46: HDR_T1.6 U4.A9 | length 895.5
  Top Layer w5: v2(1185.04,2665.35) 1185.04,2472.44 1330.71,2326.77 1330.71,2271.65 1318.9,2259.84 1318.9,2204.72 1326.77,2196.85 v1(1326.77,1984.25) U4.A9@1346.46,1964.57
  Bottom Layer w7.87: HDR_T1.6@1185.04,2606.3 v2(1185.04,2665.35) HDR_T1.6@1185.04,2606.3
EXTEND_C47: HDR_T1.3 U4.A4 | length 375.6
  Top Layer w5: U4.A4@1149.61,1964.57 1149.61,2251.97 v2(1153.54,2255.9)
  Bottom Layer w7.87: v2(1153.54,2255.9) HDR_T1.3@1153.54,2338.58
EXTEND_C48: HDR_T1.4 U4.C8 | length 1242.8
  Top Layer w5: v1(1287.4,1905.51) U4.C8@1307.09,1885.83
  MidLayer4 w5: v1(1149.21,2764.96) 1114.96,2764.96 1004.72,2654.72 1004.72,2305.51 1267.72,2042.52 1267.72,1923.62 1273.86,1917.48 v1@1284.93,1906.41
  Bottom Layer w5: v1(1149.21,2764.96) 1153.54,2760.63 HDR_T1.4@1153.54,2606.3
EXTEND_C49: HDR_T1.2 U4.B8 | length 1116.2
  Top Layer w5: v1(1287.4,1944.88) U4.B8@1307.09,1925.2
  MidLayer4 w5: v1(1117.72,2736.22) 1014.96,2633.46 1014.96,2317.32 1307.09,2025.2 1307.09,1963.78 v1@1288.19,1944.88
  Bottom Layer w5: HDR_T1.2@1122.05,2606.3 v1@1122.05,2731.89
FB: R20.2 R21.1 U6.8 | length 120.2
  Top Layer w7.87: U6.8@2842.51,1807.09 U6.8@2842.51,1808.25
  Top Layer w11.81: R20.2@2808.58,1866.14 2838.58,1866.14 ; U6.8@2838.58,1807.09 2838.58,1808.25 2838.58,1866.14 ; R21.1@2868.58,1866.14 2838.58,1866.14
FPGA_CCLK: HDR_T1.66 R17.1 | length 2147.2
  MidLayer3 w5: v2(2129.92,2665.35) 2094.49,2665.35 2078.74,2681.1 2078.74,2700.79 2102.36,2724.41 2476.38,2724.41 2527.56,2673.23 2527.56,2271.65 2507.87,2251.97 2507.87,2230.39 2322.33,2044.84 2322.33,1570.36 v1(2271.65,1519.68)
  Bottom Layer w5: v1(2271.65,1519.68) 2281.34,1510 2281.34,1314.39 R17.1@2325.28,1270.45
  Bottom Layer w7.87: HDR_T1.66@2129.92,2606.3 v2(2129.92,2665.35)
FPGA_CCLK#: R17.2 U4.AE24 | length 939.7
  Top Layer w5: U4.AE24@1936.57,1019.68 U4.AE24@1937.01,1019.68 v1(1956.69,1000)
  MidLayer3 w5: v1(1956.69,1000) 2006.69,1050 2251.97,1050 2307.84,1105.87 2433.4,1231.43 v1(2433.4,1403.2)
  Bottom Layer w5: R17.2@2367.64,1270.45 2390,1292.81 2390,1371.85 2421.35,1403.2 v1(2433.4,1403.2)
FPGA_CLK: HDR_B1.2 U4.AA13 | length 1114.4
  Top Layer w5: v1(1484.25,1157.48) U4.AA13@1503.94,1177.17
  MidLayer1 w5: v2(1122.05,665.35) 1157.48,629.92 1555.12,629.92 1582.68,657.48 1582.68,673.23 1574.8,681.1 1574.8,757.87 v1(1555.51,777.17)
  MidLayer3 w5: v1(1484.25,1157.48) 1523.62,1118.11 1523.62,809.06 v1(1555.51,777.17)
  Bottom Layer w7.87: HDR_B1.2@1122.05,606.3 v2(1122.05,665.35)
FPGA_CLK1: HDR_T1.90 U4.B13 | length 1978.2
  Top Layer w5: v1@1484.25,1944.88 U4.B13@1503.94,1925.2
  MidLayer1 w5: v1(1484.65,1945.67) 1484.65,2217.72 1511.42,2244.49 1511.42,2263.39 1527.56,2279.53 1527.56,2736.22 v1@1619.68,2828.35
  Bottom Layer w5: v1(1619.68,2827.17) 1651.18,2795.67 1669.29,2795.67 ; 1669.29,2795.28 2259.84,2795.28 2326.77,2728.35 2440.94,2728.35 2507.87,2661.42 HDR_T1.90@2507.88,2606.3
FPGA_DIN: HDR_T1.64 U4.AF24 | length 5581.6
  Top Layer w5: U4.AF24@1937.01,979.92 1950,966.93 1950,943 1929,922 1929,768 2032,665 2032,502.32 2267.32,267 2267.32,228.35 v1@2292.13,203.54
  MidLayer1 w5: v1(2240.16,1509.84) 2253,1497 2503,1497 2578,1422 3088,1422 3111,1399 3111,1068 3075.4,1032.4 3075.4,281.86 3037.54,244 2765.26,244 2712.99,191.73 2303.94,191.73 2292.91,202.76 v1@2292.13,203.54
  MidLayer3 w5: v2(2098.42,2688.98) 2122.05,2712.6 2440.94,2712.6 2452.76,2700.79 2452.76,2429.13 2484.25,2397.64 2484.25,2275.59 2496.06,2263.78 2496.06,2236.29 2309.21,2049.44 2309.21,1592.68 2240.16,1523.62 v1(2240.16,1509.84)
  Bottom Layer w7.87: v2(2098.42,2688.98) HDR_T1.64@2098.43,2606.3
  other v1: 2292.13,201.97
FPGA_DONE: HDR_T1.74 NT6.2 R8.1 R13.1 | length 4291.3
  Top Layer w5: v1(2185.04,885.83) 2185.04,700.79 2350.39,535.43 2350.39,258.27 v1(2333.07,240.94)
  MidLayer3 w5: v1(1468.5,248.03) 1484.25,248.03 1496.06,259.84 2232.68,259.84 2270.08,222.44 2314.57,222.44 v1(2333.07,240.94) ; v1@2183.86,886.22 v1@2185.04,886.22 ; v1(2185.04,885.83) v1@2185.04,886.22 ; v1(2350.39,1818.9) 2426.3,1742.99 2426.3,1588.19 2460.24,1554.25 2460.24,1233.71 2290.31,1063.78 2290.31,937.16 2239.37,886.22 v1@2185.04,886.22
  MidLayer4 w5: v2(2255.9,2665.35) 2404.33,2516.93 2404.33,2274.41 2388.58,2258.66 2388.58,2250.39 2350.39,2212.2 v1(2350.39,1818.9)
  Bottom Layer w5: NT6.2@1440.94,258.86 1457.68,258.86 v1(1468.5,248.03) ; R8.1@2325.28,1363.63 R13.1@2325.28,1410.21 2301.34,1434.15 2301.34,1747.44 2318,1764.1 2362.62,1764.1 2374.02,1775.5 2374.02,1795.28 v1(2350.39,1818.9)
  Bottom Layer w7.87: HDR_T1.74@2255.91,2606.3 v2(2255.9,2665.35)
FPGA_ID0: HDR_T1.42 NT2.1
FPGA_ID1: HDR_T1.40 NT3.1
FPGA_ID2: HDR_T1.38 NT4.1
FPGA_ID3: HDR_T1.36 NT5.1
FPGA_INIT: HDR_T1.68 R12.1 U4.AA15 | length 6193.8
  Top Layer w5: U4.AA15@1582.68,1177.17 v1(1602.36,1157.48)
  MidLayer1 w5: v1(1602.36,1157.48) 1583.05,1176.79 1551.99,1176.79 1531.89,1156.69 1531.89,895.08 1700.86,726.11 1700.86,610.17 1804.29,506.73 2754.27,506.73 2789.1,471.9 2789.1,296.9 2832,254 3033.4,254 3065.4,286 v1(3065.4,1070.7)
  MidLayer2 w5: v1(2350.39,1783.46) 2380.46,1783.46 2415,1818 3000,1818 3065.4,1752.6 v1(3065.4,1070.7)
  MidLayer4 w5: v2(2161.42,2688.98) 2161.42,2661.42 2340.16,2482.68 2340.16,2273.23 2323.62,2256.69 2323.62,2219.29 2340.39,2202.52 2340.39,1863.31 2329.8,1852.71 2329.8,1804.06 v1(2350.39,1783.46)
  Bottom Layer w5: R12.1@2325.28,1317.04 2291.34,1350.97 2291.34,1754.94 2319.86,1783.46 v1(2350.39,1783.46)
  Bottom Layer w7.87: HDR_T1.68@2161.42,2606.3 v2(2161.42,2688.98)
FPGA_INSTALLED: HDR_T1.34 NT1.1 | length 55.2
  Bottom Layer w7.87: HDR_T1.34@1625.99,2606.3 NT1.1@1625.98,2661.42
FPGA_M0: HDR_T1.60 R16.1 | length 2005.7
  Bottom Layer w5: R16.1@732.11,2061.94 757.15,2061.94 773.42,2078.21 773.42,2135.58 804.56,2166.71 884.14,2246.28 947.59,2309.74 962.63,2324.78 1059.06,2421.21 1059.06,2747.64 1142.91,2831.5 1525.98,2831.5 1602.2,2755.28 1992.76,2755.28 2039.37,2708.66 2039.37,2677.17 2035.43,2673.23 HDR_T1.60@2035.43,2606.3
FPGA_M0#: R16.2 U4.AD4 | length 2541.3
  Top Layer w5: v1(1129.92,1039.37) U4.AD4@1149.61,1059.05
  MidLayer3 w5: v1(518.57,623.86) 550.06,623.86 641.57,715.37 641.57,754.73 814.75,927.91 986.95,927.91 1068.62,1009.58 1100.14,1009.58 v1(1129.92,1039.37)
  MidLayer4 w5: v1(518.57,623.86) 503.92,623.86 421.26,706.51 421.26,1948.82 551.34,2078.9 v1(618.5,2078.9)
  Bottom Layer w5: v1(618.5,2078.9) 639.92,2057.48 685.29,2057.48 R16.2@689.74,2061.94
FPGA_M1: HDR_T1.58 R15.1 | length 2011.1
  Bottom Layer w5: R15.1@731.81,1978.35 R15.1@732.11,1978.35 769.99,1978.35 808.85,2017.2 808.85,2142.71 812.84,2146.71 904.14,2237.99 ; 904.14,2238 961.73,2295.6 976.77,2310.63 1082.68,2416.54 1082.68,2737.44 1152.72,2807.48 1511.47,2807.48 1583.68,2735.28 1961.57,2735.28 1992.13,2704.72 1992.13,2677.17 2003.94,2665.35 HDR_T1.58@2003.94,2606.3
FPGA_M1#: R15.2 U4.AC4 | length 2390.5
  Top Layer w5: v1(1129.92,1078.74) U4.AC4@1149.61,1098.42
  MidLayer3 w5: v1(562.85,699.62) 611.06,747.84 611.06,829.51 864.94,1083.38 1056.82,1083.38 1074.53,1101.1 1107.56,1101.1 v1(1129.92,1078.74)
  MidLayer4 w5: v1(562.85,699.62) 544.15,680.93 503.81,680.93 458.66,726.07 458.66,1818.5 502.36,1862.2 620.7,1862.2 v1(710.9,1952.4)
  Bottom Layer w5: R15.2@689.74,1978.35 689.74,1962.16 699.5,1952.4 v1(710.9,1952.4)
FPGA_M2: HDR_T1.56 R14.1 | length 2043.1
  Top Layer w5: v2(1972.44,2692.91) v2(2015.75,2692.91)
  Bottom Layer w5: R14.1@732.11,2020.14 757.61,2020.08 788.18,2050.66 788.18,2136.19 808.7,2156.71 894.14,2242.13 954.66,2302.67 969.7,2317.71 1070.87,2418.88 1070.87,2740.55 1149.61,2819.29 1520.47,2819.29 1594.49,2745.28 1983.07,2745.28 2015.75,2712.6 v2(2015.75,2692.91) ; HDR_T1.56@1972.44,2606.3 v2@1972.44,2688.98
FPGA_M2#: R14.2 U4.Y7 | length 2654.9
  Top Layer w5: v1(1248.03,1196.85) U4.Y7@1267.72,1216.54
  MidLayer3 w5: v1@521.52,661.25 v1(520.54,660.26) 556.94,660.26 624.84,728.16 624.84,770.47 799.01,944.64 945.62,944.64 1059.77,1058.78 1177.85,1058.78 1188.67,1069.61 1188.67,1128.65 1197.53,1137.5 1221.14,1137.5 1228.03,1144.39 1228.03,1176.85 v1(1248.03,1196.85)
  MidLayer4 w5: v1(520.54,660.26) 492.98,660.26 437.4,715.85 437.4,1901.97 521.26,1985.83 601.18,1985.83 v1@642.52,2027.17
  Bottom Layer w5: v1(644.6,2027.8) 682.08,2027.8 R14.2@689.74,2020.14
FPGA_PROG_CLK: HDR_T1.88
FPGA_PROG_PWR_ON: HDR_T1.86
FPGA_PROGRAM: HDR_T1.62 R7.1 R10.1 | length 2012.5
  Bottom Layer w5: R10.1@732.1,2103.4 R10.1@732.11,2103.73 732.1,2145.05 732.34,2145.29 769,2145.29 800.42,2176.71 ; 800.43,2176.71 874.14,2250.42 940.52,2316.81 955.55,2331.85 1047.24,2423.54 1047.24,2752.36 1138.98,2844.09 1531.5,2844.09 1610.31,2765.28 2002.44,2765.28 2066.93,2700.79 HDR_T1.62@2066.93,2606.3
FPGA_TCK: HDR_T1.72 R4.1 | length 982.8
  MidLayer3 w5: v1(2127,2128.57) 2149.61,2151.17 2149.61,2216.93 2140.14,2226.39 2140.14,2262.19 2224.41,2346.45 v2(2224.41,2688.98)
  Bottom Layer w5: v1(2127,2128.57) 2185.44,2128.57 2228.57,2171.7 2336.93,2171.7 R4.1@2381.98,2216.76
  Bottom Layer w7.87: HDR_T1.72@2224.41,2606.3 v2(2224.41,2688.98)
FPGA_TDI: HDR_T1.78 R6.1 | length 2213.4
  Bottom Layer w5: R6.1@732.41,2187.02 732.1,2186.71 796.29,2186.71 859.99,2250.42 933.45,2323.89 948.48,2338.92 1035.43,2425.87 1035.43,2759.05 1131.89,2855.51 1535.43,2855.51 1615.67,2775.28 2236.54,2775.28 2318.9,2692.91 HDR_T1.78@2318.9,2606.3
FPGA_TDO: HDR_T1.54 R5.1 R11.1 | length 877
  MidLayer4 w5: v2(1940.94,2665.35) 1942.12,2664.17 2100.79,2664.17 2299.21,2465.75 2299.21,2271.65 2305.7,2265.17 2311.3,2259.57 v1(2311.3,2150.17)
  Bottom Layer w5: R5.1@2283.16,2150.17 v1(2311.3,2150.17) R11.1@2339.56,2150.17
  Bottom Layer w7.87: HDR_T1.54@1940.95,2606.3 v2(1940.94,2665.35)
FPGA_TMS: HDR_T1.70 R3.1 | length 735.9
  MidLayer3 w5: v1(2125,2198) 2118.39,2204.61 2118.39,2263.41 2109.6,2272.2 2109.6,2294.64 2192.91,2377.95 v2(2192.91,2665.35)
  Bottom Layer w5: v1(2125,2198) 2128.2,2194.8 2261.27,2194.8 R3.1@2283.23,2216.76
  Bottom Layer w7.87: HDR_T1.70@2192.91,2606.3 v2(2192.91,2665.35)